# Altium PCB Motion Control PCB.PcbDoc (part 2 of 2)
Units mm, origin at the board's own origin, x right, y up, seen from the top; angles counter-clockwise.
Board outline 100 x 60 mm, 4 copper layers (Top Layer, Signal Layer 1, Signal Layer 2, Bottom Layer), stack 1.642 mm thick; 129 components, 65 nets, 423 pads, 398 vias.
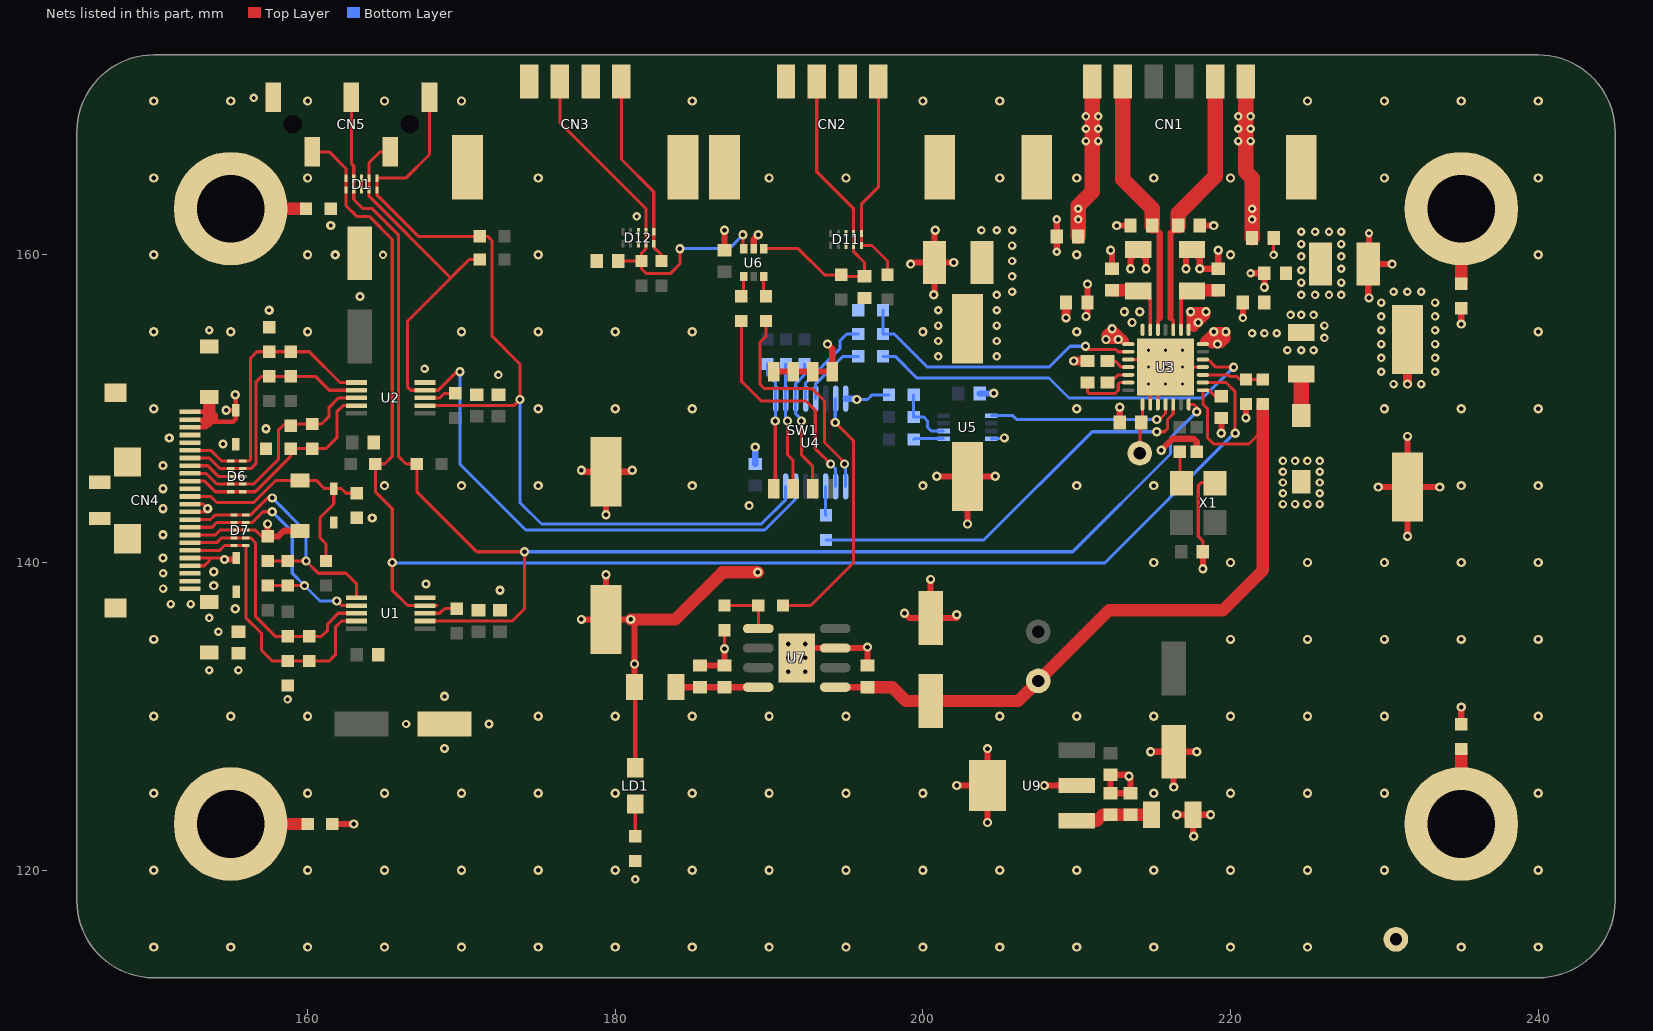
[diagram p4: the nets of this part, all layers, seen from the top]

## Via types
v1: diameter 0.6, hole 0.3, Top Layer to Bottom Layer, tented both sides, 244 vias
v2: diameter 0.55, hole 0.25, Top Layer to Bottom Layer, tented both sides, 113 vias
v3: diameter 0.6, hole 0.25, Top Layer to Bottom Layer, tented both sides, 20 vias
v4: diameter 0.6, hole 0.3, Top Layer to Bottom Layer, 12 vias
v5: diameter 0.5, hole 0.2, Top Layer to Bottom Layer, 9 vias

## Nets (pads, with @x,y where several pads share a name; then routed paths per layer and width w, separated by ;. In a path a pad name is that pad's centre, name@x,y a point inside that pad or via, vN(x,y) a via of type N, cw(c..) or ccw(c..) an arc to the next point about the centre after c; other vN are vias at no path point) (continued)
GND: C1.- C2.1 C3.1 C4.1 C5.- C6.1 C7.1 C8.1 C9.1 C10.1 C11.1 C12.2 C13.2 C16.1 C17.1 C18.1 C19.1 C20.1 C21.1 C22.1 C23.1 C24.1 C25.1 C26.1 C27.1 C28.1 C29.1 C30.- C32.1 C33.- C34.1 C39.1 C40.- C41.- C42.1 C46.- C47.1 C48.1 C49.1 CN1.MP1 CN1.MP2 CN2.2 CN2.4 CN2.MP1 CN2.MP2 CN3.2 CN3.4 CN3.MP1 CN3.MP2 CN4.4 CN4.5 CN4.8 CN4.11 CN4.13 CN4.14 CN4.17 CN4.20 CN4.21 CN4.25 CN4.26 CN4.27 CN4.28 CN4.29 CN4.30 CN5.1 D1.3 D1.8 D2.A D3.A D4.2 D5.2 D6.3 D6.8 D7.3 D7.8 D8.2 D9.A D11.3 D11.8 D12.3 D12.8 R1.2 R6.2 R7.2 R13.2 R14.1 R20.2 R21.1 R22.1 R23.1 R32.2 R33.1 R41.1 R42.1 R43.1 R44.1 R70.1 R75.1 SW1.5 SW1.6 SW1.7 SW1.8 U1.5 U2.5 U3.3 U3.9 U3.10 U3.18 U3.29 U4.8 U5.4 U6.2 U7.3 U7.9 U9.2 U9.4 X1.2 | length 154.6
  Top Layer w0.2: CN4.21@152.36,139.79 153.29,139.79 153.6,140.1 153.6,140.29 ; CN4.20@152.36,140.29 153.6,140.29 ; CN4.17@152.36,141.79 153.99,141.79 154.3,142.1 D7.8@155.213,142.1 D7.3@155.988,142.1 156.6,142.1 157,141.7 R1.2@157.4,141.7 ; CN4.14@152.36,143.29 153.29,143.29 v3(153.5,143.5) 153.21,143.79 CN4.13@152.36,143.79 ; CN4.8@152.36,146.29 153.51,146.29 154.2,145.6 D6.8@155.012,145.6 D6.3@155.787,145.6 ; v3(154.6,140.2) 154.51,140.29 153.6,140.29 ; D1.3@163.5,164.213 D1.8@163.5,164.988 ; D12.8@181.5,160.725 D12.3@181.5,161.5 ; v1(187.1,134.4) R23.1@187.1,135.6 ; U3.3@213.35,153.2 215.275,153.2 v5(215.775,152.7) ; U3.9@214.775,150.275 214.775,151.7 U3.29@215.275,152.2 ; U3.10@215.275,150.275 U3.29@215.275,152.2 ; C39.1@218.2,140.7 218.2,141.4 217.9,141.7 217.9,145 218.1,145.2 218.66,145.2 X1.2@219,145.54 ; U3.18@218.2,152.7 v5(216.875,152.7) v5(215.775,152.7) ; v2(222.8,160) C16.1@222.8,161.1 ; U3.29@215.275,152.2 v5(215.775,152.7)
  Top Layer w0.4: v3(154.6,140.2) 155.27,140.2 D4.2@155.36,140.29 ; v1(157.4,142.5) R1.2@157.4,141.7 158.1,141.7 158.46,142.06 D9.A@159.5,142.06 ; R43.1@161.6,123 v1(163,123) ; v1(177.8,146) 177.9,145.9 C41.-@179.4,145.9 ; v1(179.4,143.1) C41.-@179.4,145.9 ; v1(181.1,146) 181,145.9 C41.-@179.4,145.9 ; C29.1@185.5,133.3 C32.1@187.1,133.3 v1(187.1,134.4) ; C27.1@187.1,160.3 v1(187.1,161.6) ; U6.2@189,160.4 189,161 v1(189.3,161.3) ; SW1.8@190.295,152.41 SW1.7@191.565,152.41 SW1.6@192.835,152.41 SW1.5@194.105,152.41 194.105,153.895 v1(193.8,154.2) ; U7.9@191.8,133.8 192.435,134.435 U7.3@194.3,134.435 v1@196.335,134.435 ; C42.1@196.4,133.3 196.4,134.37 v1@196.335,134.435 ; v1(196.4,134.5) v1@196.335,134.435 ; v1(198.8,136.7) 199.1,136.4 C30.-@200.5,136.4 ; v1(199.2,159.4) 199.3,159.5 C12.2@200.75,159.5 ; v1(200.5,138.9) C30.-@200.5,136.4 ; v1(200.7,157.4) 200.75,157.45 C12.2@200.75,159.5 ; v1(200.8,161.6) 200.75,161.55 C12.2@200.75,159.5 ; v1(200.9,145.6) C33.-@202.9,145.6 ; v1(202,159.5) C12.2@200.75,159.5 ; v1(202.2,125.5) U9.4@204.2,125.5 ; v1(202.2,136.6) 202.2,136.4 C30.-@200.5,136.4 ; v1(202.9,142.5) C33.-@202.9,145.6 ; v1(204.2,123.1) U9.4@204.2,125.5 ; v1(204.2,127.9) U9.4@204.2,125.5 ; v1(204.7,145.6) C33.-@202.9,145.6 ; v1(207.9,125.5) U9.2@210,125.5 ; v2(208.7,160.2) v2(208.7,162.3) ; v1(210.6,156) 210.7,156 C9.1@210.7,156.9 v1(210.7,158.1) ; v1(212.2,160.3) 212.3,160.2 C20.1@212.3,159.1 ; v1(212.6,161.9) C18.1@213.5,161.9 ; C23.1@212.8,149.1 v1(212.8,150.1) ; v1(213.5,159.1) 213.5,159.75 R32.2@214,160.25 ; v1(214.5,159.1) 214.5,159.75 ; v1(214.8,127.7) C46.-@216.3,127.7 ; v1(215.5,147.3) 216.25,148.05 217.6,148.05 217.8,147.85 R70.1@217.8,147.2 ; v1(216.3,125.4) C46.-@216.3,127.7 ; v1(217.1,159.1) 217.1,159.85 217.5,160.25 218,159.75 v1(218,159.1) C21.1@219.2,159.1 v1(219.2,160.3) ; v1(217.8,127.7) C46.-@216.3,127.7 ; C17.1@218,161.9 v1(218.9,161.9) ; v1(218.2,139.6) C39.1@218.2,140.7 ; v1(219.4,148.4) C24.1@219.4,149.4 ; v2(220.8,155.9) C10.1@220.8,156.9 ; v1(221,149.4) R75.1@221,150.3 ; v2(221.3,158.8) C11.1@222.2,158.8 v1(222.2,157.9) ; v1(229,157.2) 228.95,157.25 C13.2@228.95,159.4 ; v2(229,161.4) 229,159.45 C13.2@228.95,159.4 ; v1(230.5,159.4) C13.2@228.95,159.4 ; v1(231.5,141.7) C40.-@231.5,144.9 ; v1(231.5,148.2) C40.-@231.5,144.9 ; v1(233.6,144.9) C40.-@231.5,144.9 ; R44.1@235,129.481 v1(235,130.6) ; v1(235,155.5) R42.1@235,156.519 ; R32.2@214,160.25 214.25,160.25 214.5,160 214.5,159.75 ; R32.2@214,160.25 214.5,159.75 ; C40.-@231.5,144.9 v1(229.6,144.9) C40.-@231.5,144.9 ; C48.1@212.2,125 C49.1@212.2,126.2 213.3,126.2 v1(213.4,126.1) 213.5,126 C47.1@213.5,125 C48.1@212.2,125
  Bottom Layer w0.2: v1(195.7,150.6) 196.4,150.6 196.7,150.9 R22.1@197.8,150.9 ; U5.4@204.45,148.05 205.25,148.05 v1(205.3,148.1)
  Bottom Layer w0.4: C22.1@189.1,146.4 v1(189.1,147.5) ; U4.8@194.975,150.65 195.65,150.65 v1(195.7,150.6) ; C25.1@203.7,150.979 204.579,150.979 v1(204.6,151)
  other v1: 150,115 155,115 160,115 165,115 170,115 175,115 180,115 185,115 190,115 195,115 200,115 205,115 210,115 215,115 220,115 225,115 235,115 240,115 150,120 160,120 165,120 170,120 175,120 180,120 185,120 190,120 195,120 200,120 205,120 210,120 215,120 220,120 225,120 230,120 240,120 150,125 160,125 165,125 170,125 175,125 180,125 185,125 190,125 195,125 200,125 215,125 220,125 225,125 230,125 240,125 150,130 155,130 160,130 175,130 180,130 185,130 190,130 195,130 205,130 210,130 215,130 220,130 225,130 230,130 240,130 150,135 220,135 225,135 230,135 235,135 240,135 215,140 220,140 225,140 230,140 235,140 240,140 188.7,143.7 165,145 170,145 175,145 185,145 200,145 210,145 215,145 235,145 240,145 150,150 175,150 180,150 185,150 210,150 230,150 235,150 240,150 150,155 155,155 160,155 170,155 175,155 180,155 185,155 200,155 210,155 240,155 150,160 160,160 175,160 210,160 220,160 240,160 150,165 160,165 175,165 190,165 195,165 205,165 210,165 215,165 220,165 230,165 240,165 150,170 155,170 160,170 165,170 170,170 185,170 200,170 205,170 225,170 230,170 235,170 240,170
  other v2: 181.3,119.4 166.4,129.5 158.7,131.1 153.6,133 155.5,133 172.4,152.2 167.6,152.6 153.6,155.1 164.9,160 181.4,162.5 156.5,170.2
  other v3: 168.9,127.9 171.8,129.5 168.9,131.3 172.5,138.2 167.7,138.6 150.6,140.3 150.6,141.8 164.2,142.9 150.6,143.5 150.6,144.8 150.6,146.3 154.5,147.7 151,148.1 157.3,148.7 157.5,156.4 163.4,157.3 161.8,160 161.5,161.9
  other v4: 191.25,132.9 192.35,132.9 191.25,133.8 192.35,133.8 191.25,134.7 192.35,134.7
  other v5: 214.675,151.6 215.775,151.6 216.875,151.6 214.675,152.7 214.675,153.8 215.775,153.8 216.875,153.8
HV_CBL_DISC: CN4.12 D8.1 D9.C R14.2 R24.2 | length 17.2
  Top Layer w0.2: CN4.12@152.36,144.29 153.71,144.29 154.1,143.9 156.5,143.9 157.94,145.34 D9.C@159.5,145.34 160.56,145.34 161.1,144.8 D8.1@161.7,144.8 ; R24.2@161.2,140.1 161.2,141.2 160.8,141.6 160.8,142.9 161.7,143.8 D8.1@161.7,144.8 ; R14.2@163.2,144.5 162.5,144.5 162.2,144.8 D8.1@161.7,144.8
INDEX: R31.2 U3.12 | length 26.9
  Top Layer w0.2: v1(215.2,148.5) 215.7,148.5 215.9,148.7 215.9,149.3 216.275,149.675 U3.12@216.275,150.275
  Bottom Layer w0.2: R31.2@193.7,141.469 203.969,141.469 211,148.5 v1(215.2,148.5)
LV_SCL_TEST: CN5.4 D1.4 D1.7 R17.1 U2.4 U4.14 | length 57.3
  Top Layer w0.2: CN5.4@165.38,166.7 164.7,166.7 164,166 D1.7@164,164.988 D1.4@164,164.213 164,163.8 169.3,158.5 ; v1(169.9,152.4) 169.7,152.4 168.5,151.2 U2.4@167.625,151.2 166.7,151.2 166.5,151.4 166.5,155.7 169.3,158.5 ; R17.1@171.2,159.7 170.5,159.7 169.6,158.8 169.3,158.5
  Bottom Layer w0.2: v1(169.9,152.4) 169.9,146.4 174.2,142.1 189.7,142.1 191.725,144.125 U4.14@191.725,144.95
LV_SDA_TEST: CN5.5 D1.5 D1.6 R16.1 U2.2 U4.15 | length 61.1
  Top Layer w0.2: U2.2@167.625,150.2 173.4,150.2 v1(173.8,150.6) 173.8,152.9 172,154.7 172,160.9 171.7,161.2 R16.1@171.2,161.2 167.2,161.2 164.5,163.9 D1.5@164.5,164.213 D1.6@164.5,164.988 166.388,164.988 167.92,166.52 CN5.5@167.92,170.255
  Bottom Layer w0.2: v1(173.8,150.6) 173.8,143.9 175.2,142.5 189.5,142.5 191.075,144.075 U4.15@191.075,144.95
LV_STEP_TEST: CN5.2 D1.1 D1.10 R19.1 U1.4 U3.16 | length 99.7
  Top Layer w0.2: CN5.2@160.3,166.7 161.4,166.7 162.5,165.6 D1.10@162.5,164.988 D1.1@162.5,164.213 162.5,163.2 163.2,162.5 164,162.5 165.5,161 165.5,146.9 165,146.4 R19.1@164.4,146.4 164.4,144.6 165.5,143.5 v1(165.5,140) 165.5,138.2 166.5,137.2 U1.4@167.625,137.2 168.4,137.2 ; U3.16@218.2,151.7 219.704,151.7 220.3,151.104 v1(220.3,148.4)
  Bottom Layer w0.2: v1(165.5,140) 165.54,139.96 211.809,139.96 220.249,148.4 v1(220.3,148.4)
LV_UART_TEST: CN5.3 D1.2 D1.9 R18.1 U1.2 U3.14 | length 96.4
  Top Layer w0.2: CN5.3@162.84,170.255 162.84,165.96 163,165.8 D1.9@163,164.988 D1.2@163,164.213 163,163.6 163.6,163 164.2,163 165.9,161.3 165.9,146.9 166.4,146.4 R18.1@167.1,146.4 167.1,144.6 171,140.7 v1(174.1,140.7) 174.1,137 173.3,136.2 U1.2@167.625,136.2 ; U3.14@217.275,150.275 217.625,150.275 217.8,150.1 v1(217.8,149.8)
  Bottom Layer w0.2: v1@174.1,140.5 174.3,140.7 209.749,140.7 216.1,147.051 216.1,148.1 v1(217.8,149.8)
NetC9_2: C9.2 C10.2 C11.2 C12.1 C13.1 C14.2 C33.+ C40.+ FB4.1 U3.22 U3.28 | length 9.9
  Top Layer w0.25: U3.22@217.275,155.125 217.275,156.175 v1(217.4,156.3)
  Top Layer w0.6: v1(209.3,155.9) C9.2@209.3,156.9 ; v1(209.8,153.1) C14.2@210.7,153.1 ; v1(217.4,156.3) v1(218.4,156.3) v1@218.4,156.1 ; C40.+@231.4,154.4 C40.+@231.5,154.5 v1(231.5,151.6) ; v1@218.4,156.1 217.9,156.1 217.6,155.8 217.6,155.3 v1(217.9,155.6) v1@218.4,156.1
  other v1: 213.6,155.6 213.1,156.3 214.1,156.3
  other v2: 230.6,151.6 232.4,151.6 229.8,152.4 233.3,152.4 229.8,153.3 233.3,153.3 201,153.4 204.8,153.4 223.7,153.8 224.6,153.8 225.4,153.8 229.8,154.2 233.3,154.2 201,154.4 204.8,154.4 226.1,154.6 221.4,154.9 222.2,154.9 223,154.9 229.8,155.1 233.3,155.1 201,155.4 204.8,155.4 226.1,155.4 229.8,156 233.3,156 223.9,156.1 224.6,156.1 225.4,156.1 201,156.4 204.8,156.4 229.8,156.9 233.3,156.9 204.8,157.4 224.6,157.4 225.5,157.4 226.4,157.4 227.2,157.4 205.8,157.6 230.6,157.6 231.5,157.6 232.4,157.6 224.6,158.2 227.2,158.2 205.8,158.6 224.6,159 227.2,159.1 205.8,159.6 224.6,159.9 227.2,159.9 205.8,160.6 224.6,160.7 227.2,160.7 224.6,161.5 225.5,161.5 226.4,161.5 227.2,161.5 203.8,161.6 204.8,161.6 205.8,161.6
NetC14_1: C14.1 U3.6 | length 3.8
  Top Layer w0.2: C14.1@210.7,151.7 210.7,151.1 210.8,151 212.5,151 212.55,151.05 212.554,151.05 212.7,151.196 212.7,151.6 212.8,151.7 U3.6@213.35,151.7
NetC15_1: C15.1 U3.5 | length 1.6
  Top Layer w0.2: C15.1@212,151.7 212.2,151.7 212.7,152.2 U3.5@213.35,152.2
NetC15_2: C15.2 U3.4 | length 1.5
  Top Layer w0.2: C15.2@212,153.1 212.5,153.1 212.9,152.7 U3.4@213.35,152.7
NetC16_2: C16.2 CN1.1 U3.21 | length 15.5
  Top Layer w0.2: U3.21@218.2,154.2 218.7,154.2
  Top Layer w0.6: 218.3,154.375 v4@218.9,154.975 ; 218.744,154.244 218.788,154.2 v4(219.15,154.2) ; v4@218.9,154.975 v4(218.9,155) ; v4@218.9,154.975 218.9,154.45 v4(219.15,154.2) ; v4(218.9,155) 219.15,154.75 v4(219.15,154.2) ; v4(218.9,155) v4(219.7,155) 219.7,154.551 219.349,154.2 v4(219.15,154.2)
  Top Layer w1: CN1.1@221,170.88 221,168.2 221,165.4 221.4,165 v2(221.4,163) v2(221.4,162.3) C16.2@221.4,161.1
  other v2: 220.5,167.4 221.3,167.4 220.5,168.2 221.3,168.2 220.5,169 221.3,169
NetC17_2: C17.2 CN1.2 U3.24 | length 17
  Top Layer w0.25: 216.1,155.9 216.275,155.725 U3.24@216.275,155.125
  Top Layer w0.4: 216.1,155.9 216.1,161.4 C17.2@216.6,161.9
  Top Layer w1: C17.2@216.6,161.9 216.6,162.7 219,165.1 CN1.2@219,170.88
NetC18_2: C18.2 CN1.5 U3.26 | length 16.8
  Top Layer w0.25: U3.26@215.275,155.125 215.275,155.775 215.4,155.9
  Top Layer w0.4: C18.2@214.9,161.9 215.4,161.4 215.4,155.9
  Top Layer w1: CN1.5@213,170.88 213,164.9 214.9,163 C18.2@214.9,161.9
NetC19_2: C19.2 CN1.6 U3.1 | length 13.6
  Top Layer w0.2: 212.961,154.3 213.061,154.2 U3.1@213.35,154.2
  Top Layer w0.6: 213.1,154.4 212.7,154.8 ; 212.7,154.8 v4(212.7,154.5) v4(211.9,154.5) 211.9,154.8 v4(212.3,155.2) 212.7,154.8
  Top Layer w1: C19.2@210.1,161.2 210.1,163.2 211,164.1 CN1.6@211,170.88
  other v2: 210.1,162.3 210.1,163 210.6,167.4 211.4,167.4 210.6,168.2 211.4,168.2 210.6,169 211.4,169
NetC20_2: C20.2 R32.1 U3.27 | length 4.6
  Top Layer w0.25: R32.1@214,157.65 214.3,157.65 214.725,157.225 214.725,157.129 214.775,157.079 U3.27@214.775,155.125
  Top Layer w0.8: C20.2@212.3,157.7 R32.1@213.85,157.7
NetC21_2: C21.2 R33.2 U3.23 | length 4.9
  Top Layer w0.25: U3.23@216.775,155.125 216.775,157.225 217.2,157.65 R33.2@217.5,157.65 R33.2@217.5,157.55
  Top Layer w0.8: R33.2@217.5,157.55 217.65,157.7 C21.2@219.2,157.7
NetC23_2: C23.2 TP4.1 U3.8 | length 3.2
  Top Layer w0.2: TP4.1@214.1,147.1 214.1,149 214.275,149.175 U3.8@214.275,150.275
NetC29_2: C29.2 C32.2 FB1.2 U7.8 | length 5.4
  Top Layer w0.4: FB1.2@183.95,131.9 183.955,131.895 U7.8@189.3,131.895
NetC47_2: C47.2 C48.2 FB3.2 U9.1 | length 5
  Top Layer w0.8: U9.1@210,123.2 211.3,123.2 211.7,123.6 C48.2@212.2,123.6 FB3.2@214.85,123.6
NetD10_2: D10.2 FB4.2 | length 2.7
  Top Layer w1: D10.2@224.6,149.56 FB4.2@224.6,152.25
NetLD1_2: LD1.2 R20.1 | length 2.1
  Top Layer w0.2: R20.1@181.3,122.2 LD1.2@181.3,124.3
NetMP1_1: MP1.1 R41.2 | length 4.9
  Top Layer w0.8: MP1.1@155,163 R41.2@159.9,163
NetMP2_1: MP2.1 R42.2 | length 4.9
  Top Layer w0.8: R42.2@235,158.119 MP2.1@235,163
NetMP3_1: MP3.1 R43.2 | length 5
  Top Layer w0.8: MP3.1@155,123 R43.2@160,123
NetMP4_1: MP4.1 R44.2 | length 4.9
  Top Layer w0.8: MP4.1@235,123 R44.2@235,127.881
NetR12_2: R12.2 U2.3 | length 2.1
  Top Layer w0.2: U2.3@167.625,150.7 168.6,150.7 168.9,151 R12.2@169.6,151
NetR15_2: R15.2 U1.3 | length 2.2
  Top Layer w0.2: U1.3@167.625,136.7 168.6,136.7 168.9,137 R15.2@169.7,137
NetR21_2: R21.2 R29.2 U3.2 | length 19.1
  Top Layer w0.2: v1(210.573,154.059) 210.782,153.85 212.55,153.85 212.7,153.7 U3.2@213.35,153.7
  Bottom Layer w0.2: R21.2@197.4,156.4 R29.2@197.4,154.854 198.146,154.854 200.3,152.7 208.2,152.7 209.559,154.059 v1(210.573,154.059)
NetR22_2: R22.2 R40.2 U5.6 | length 4
  Bottom Layer w0.2: R22.2@199.4,150.9 R40.2@199.4,149.454 200.046,149.454 200.3,149.2 200.3,148.8 200.55,148.55 U5.6@201.35,148.55
NetR23_2: R23.2 R73.2 U7.5 | length 3.7
  Top Layer w0.2: R23.2@187.1,137.2 R73.2@189.3,137.2 U7.5@189.3,135.705
NetR29_1: R29.1 U4.4 | length 6.1
  Bottom Layer w0.2: U4.4@192.375,150.65 192.375,151.675 194.6,153.9 194.6,154.4 195.054,154.854 R29.1@195.8,154.854
NetR30_2: R30.2 X1.3 | length 1.7
  Top Layer w0.2: R30.2@216.7,147.2 216.7,145.64 X1.3@216.8,145.54
NetR31_1: R31.1 U4.11 | length 1.9
  Bottom Layer w0.2: U4.11@193.675,144.95 193.675,143.094 R31.1@193.7,143.069
NetR34_1: R34.1 U4.5 | length 4.5
  Bottom Layer w0.2: U4.5@193.025,150.65 193.025,151.625 194.8,153.4 R34.1@195.8,153.4
NetR34_2: R34.2 U3.19 | length 27
  Top Layer w0.2: U3.19@218.2,153.2 218.546,153.2 219.046,152.7 v1(220.2,152.7)
  Bottom Layer w0.2: R34.2@197.4,153.4 198.2,153.4 199.6,152 208.2,152 209.5,150.7 218.2,150.7 v1(220.2,152.7)
NetR35_1: R35.1 SW1.1 U4.1 | length 8.4
  Top Layer w0.2: SW1.1@190.295,144.79 190.4,144.895 v1(190.4,149.2)
  Bottom Layer w0.2: R35.1@189.9,152.9 189.9,152.2 190.425,151.675 U4.1@190.425,150.65 190.425,149.225 v1(190.4,149.2)
NetR36_1: R36.1 SW1.2 U4.2 | length 8.3
  Top Layer w0.2: v1(191.2,149.2) 191.2,147 191.565,146.635 SW1.2@191.565,144.79
  Bottom Layer w0.2: R36.1@191.1,152.9 191.075,152.875 U4.2@191.075,150.65 191.075,149.325 v1(191.2,149.2)
NetR37_1: R37.1 SW1.3 U4.3 | length 9
  Top Layer w0.2: v1@192.15,149.15 192.2,149.2 v1(192.1,149.2) 192.1,147 192.835,146.265 SW1.3@192.835,144.79
  Bottom Layer w0.2: v1(192.1,149.2) 192.1,149.3 191.725,149.675 U4.3@191.725,150.65 191.725,151.625 192.3,152.2 R37.1@192.3,152.9
NetR39_1: R39.1 U5.5 | length 2
  Bottom Layer w0.2: R39.1@199.4,148 199.45,148.05 U5.5@201.35,148.05
NetR71_1: R71.1 U4.9 | length 15
  Top Layer w0.2: R71.1@189.8,155.7 189.8,154.7 189.4,154.3 189.4,151.6 189.7,151.3 192.8,151.3 193.6,150.5 193.6,147.8 194.9,146.5 v1(194.9,146.4)
  Bottom Layer w0.2: v1(194.9,146.4) 194.975,146.325 U4.9@194.975,144.95
NetR71_2: R71.2 U6.6 | length 1.4
  Top Layer w0.2: U6.6@189.65,158.6 189.65,157.45 R71.2@189.8,157.3
NetR72_1: R72.1 U4.10 | length 15
  Top Layer w0.2: R72.1@188.2,155.7 188.2,151.8 189.5,150.5 192.4,150.5 193,149.9 193,147.4 v1(194,146.4)
  Bottom Layer w0.2: v1(194,146.4) 194.325,146.075 U4.10@194.325,144.95
NetR72_2: R72.2 U6.4 | length 1.4
  Top Layer w0.2: R72.2@188.2,157.3 188.35,157.45 U6.4@188.35,158.6
NetR73_1: R73.1 U4.7 | length 16.9
  Top Layer w0.2: R73.1@190.9,137.2 192.7,137.2 195.5,140 195.5,147.9 v1(194.3,149.1)
  Bottom Layer w0.2: v1(194.3,149.1) 194.3,150.625 U4.7@194.325,150.65
NetR74_1: R74.1 R75.2 U3.17 | length 4
  Top Layer w0.2: U3.17@218.2,152.2 219.851,152.2 219.951,152.1 220.4,152.1 220.6,151.9 R75.2@221,151.9 R74.1@222.1,151.9
NetU3_11: U3.11 U5.1 | length 12.2
  Top Layer w0.2: v1(215.2,149.3) 215.393,149.3 215.775,149.682 U3.11@215.775,150.275
  Bottom Layer w0.2: U5.1@204.45,149.55 205.85,149.55 206.1,149.3 v1(215.2,149.3)
OP1_1: CN2.1 D11.1 D11.10 R47.1 | length 13.7
  Top Layer w0.2: CN2.1@197.1,170.88 197.1,164.4 196,163.3 D11.1@196,161.388 D11.10@196,160.613 196.688,160.613 197.7,159.6 R47.1@197.7,158.7
OP1_3: C26.2 CN2.3 D11.2 D11.9 R45.1 U6.1 | length 20.9
  Top Layer w0.2: U6.1@189.65,160.4 191.9,160.4 193.6,158.7 R45.1@194.7,158.7 194.8,158.6 C26.2@196.2,158.6 196.2,159.5 195.5,160.2 D11.9@195.5,160.613 D11.2@195.5,161.388 195.5,163 193.1,165.4 CN2.3@193.1,170.88
OP2_1: CN3.1 D12.1 D12.10 R46.1 | length 12.4
  Top Layer w0.2: CN3.1@180.4,170.88 180.4,166.2 182.5,164.1 D12.1@182.5,161.5 D12.10@182.5,160.725 182.5,160.5 183,160 R46.1@183,159.6
OP2_3: C28.2 CN3.3 D12.2 D12.9 R48.1 U6.3 | length 25
  Top Layer w0.2: CN3.3@176.4,170.88 176.4,168.6 182,163 D12.2@182,161.5 D12.9@182,160.725 182,160.4 181.7,160.1 R48.1@181.7,159.6 ; C28.2@180.2,159.6 R48.1@181.7,159.6 ; v1(184.2,160.4) 184.2,159.4 183.6,158.8 182,158.8 181.7,159.1 R48.1@181.7,159.6 ; v1(188.3,161.3) 188.3,160.45 U6.3@188.35,160.4
  Bottom Layer w0.2: v1(184.2,160.4) 187.4,160.4 v1(188.3,161.3)
SCL+: CN4.7 D6.4 D6.7 R8.2 R9.1 U2.7 | length 17.1
  Top Layer w0.2: CN4.7@152.36,146.79 153.61,146.79 154.3,146.1 D6.7@155.012,146.1 D6.4@155.787,146.1 156.3,146.1 156.65,146.45 156.65,151.75 157,152.1 R8.2@158.9,152.1 160.5,152.1 161.4,151.2 U2.7@163.175,151.2
SCL-: CN4.6 D6.5 D6.6 R7.1 R8.1 U2.6 | length 18.7
  Top Layer w0.2: CN4.6@152.36,147.29 153.71,147.29 154.4,146.6 D6.6@155.012,146.6 D6.5@155.787,146.6 156.2,146.6 156.3,146.7 156.3,153.3 156.7,153.7 R7.1@157.5,153.7 R8.1@158.9,153.7 160.1,153.7 162.1,151.7 U2.6@163.175,151.7
SDA+: CN4.9 D6.2 D6.9 R10.1 R11.1 U2.8 | length 14.9
  Top Layer w0.2: CN4.9@152.36,145.79 153.41,145.79 154.1,145.1 D6.9@155.012,145.1 D6.2@155.787,145.1 156.5,145.1 158.1,146.7 158.1,148.6 158.5,149 R11.1@160.3,149 160.9,149 161.4,149.5 161.4,150.1 162,150.7 U2.8@163.175,150.7
SDA-: CN4.10 D6.1 D6.10 R11.2 R13.1 U2.9 | length 14.7
  Top Layer w0.2: CN4.10@152.36,145.29 153.31,145.29 154,144.6 D6.10@155.012,144.6 D6.1@155.787,144.6 156.6,144.6 158.9,146.9 R13.1@158.9,147.4 R11.2@160.3,147.4 161.2,147.4 161.9,148.1 161.9,149.8 162.3,150.2 U2.9@163.175,150.2
STEP+: CN4.16 D7.4 D7.7 R2.2 R3.1 U1.7 | length 17.7
  Top Layer w0.2: CN4.16@152.36,142.29 153.79,142.29 154.1,142.6 D7.7@155.213,142.6 D7.4@155.988,142.6 156.4,142.6 157.1,143.3 v1(157.7,143.3) ; R3.1@157.4,138.5 R2.2@158.7,138.5 v1(159.8,138.5) ; v1(161.9,137.5) 162.2,137.2 U1.7@163.175,137.2
  Bottom Layer w0.2: v1(157.7,143.3) 159,142 159,139.3 v1(159.8,138.5) 160.8,137.5 v1(161.9,137.5)
STEP-: CN4.15 D7.5 D7.6 R1.1 R2.1 U1.6 | length 18.2
  Top Layer w0.2: CN4.15@152.36,142.79 153.69,142.79 154,143.1 D7.6@155.213,143.1 D7.5@155.988,143.1 156.3,143.1 157.4,144.2 v1(157.7,144.2) ; R1.1@157.4,140.1 v1(159.9,140.1) 160.7,139.3 162.5,139.3 163.175,138.625 U1.6@163.175,137.7
  Bottom Layer w0.2: v1(157.7,144.2) 159.9,142 v1(159.9,140.1)
UART+: CN4.18 D7.2 D7.9 R4.1 R5.1 U1.8 | length 17.3
  Top Layer w0.2: CN4.18@152.36,141.29 154.09,141.29 154.4,141.6 D7.9@155.213,141.6 D7.2@155.988,141.6 156.3,141.6 156.6,141.3 156.6,136.5 157.9,135.2 R5.1@160.1,135.2 160.9,135.2 161.3,135.6 161.3,136 162,136.7 U1.8@163.175,136.7
UART-: CN4.19 D7.1 D7.10 R5.2 R6.1 U1.9 | length 19.6
  Top Layer w0.2: CN4.19@152.36,140.79 154.29,140.79 154.6,141.1 D7.10@155.213,141.1 D7.1@155.988,141.1 155.988,136.412 157,135.4 157,134.3 157.7,133.6 R5.2@160.1,133.6 161.4,133.6 161.8,134 161.8,135.8 162.2,136.2 U1.9@163.175,136.2
VIO_M: C24.2 C30.+ C42.2 R74.2 TP2.1 U3.15 U7.1 | length 51.2
  Top Layer w0.2: C24.2@219.4,150.8 219,150.8 218.6,151.2 U3.15@218.2,151.2 218.2,150.3 218.5,150 218.5,148.1 218.9,147.7 221.2,147.7 222.1,148.6
  Top Layer w0.4: U7.1@194.3,131.895 196.395,131.895 C42.2@196.4,131.9
  Top Layer w0.8: C42.2@196.4,131.9 198,131.9 198.9,131 C30.+@200.5,131 206.2,131 TP2.1@207.5,132.3 212.1,136.9 219.5,136.9 222.1,139.5 222.1,148.6 R74.2@222.1,150.3
VM: C34.2 C41.+ CN4.1 CN4.2 CN4.3 CN4.22 CN4.23 CN4.24 D2.C D3.C D4.1 D5.1 D10.1 FB1.1 FB3.1 LD1.1 TP1.1 | length 40
  Top Layer w0.2: v2(150.6,139.3) v2@150.605,139.295 ; v2@150.605,138.295 v2(150.6,138.3) v2@150.62,138.3 ; v2@152.35,137.35 v2(152.4,137.3) v2@152.495,137.3 ; CN4.24@152.355,138.295 CN4.24@152.36,138.29 CN4.24@152.4,138.25 ; CN4.22@152.355,139.295 CN4.22@152.36,139.29 ; D4.1@155.301,138.149 D4.1@155.36,138.09
  Top Layer w0.3: CN4.3@152.36,148.79 153.39,148.79 153.755,149.155 ; CN4.2@152.36,149.29 153.31,149.29 153.445,149.155 153.755,149.155 ; CN4.1@152.36,149.79 153.6,149.79 153.81,149.79 154.03,149.57 154.03,149.155 ; v1(154.7,149.9) 154.71,149.89 D5.1@155.33,149.89 ; v1(155.3,150.9) 155.33,150.87 D5.1@155.33,149.89 ; D4.1@155.33,138.06 D4.1@155.36,138.09 ; FB1.1@181.25,131.9 181.3,131.85 LD1.1@181.3,126.65 ; 153.755,149.155 154.03,149.155 ; 154.03,149.155 155.155,149.155 155.33,149.33 D5.1@155.33,149.89
  Top Layer w0.4: v1(177.8,136.3) C41.+@179.4,136.3 ; C41.+@179.35,136.25 C41.+@179.4,136.3 ; v1(179.4,139.2) C41.+@179.4,136.3 ; v1(181,136.3) C41.+@179.4,136.3 ; FB1.1@181.25,131.9 v1(181.25,133.4) v1@181.25,136.25 ; v1(216.5,123.6) FB3.1@217.55,123.6 ; v1(217.6,122.2) 217.55,122.25 FB3.1@217.55,123.6 ; v1(218.7,123.6) FB3.1@217.55,123.6
  Top Layer w0.8: 153.445,149.155 153.6,149.31 153.6,149.79 D3.C@153.6,150.76 ; v1(181,136.3) 183.9,136.3 186.96,139.36 v1(189.26,139.36)
  other v1: 155.3,137 153.9,138.5 153.9,139.4
  other v2: 154.2,135.5 153.6,136.4 151.1,137.3 223.4,143.8 224.2,143.8 225,143.8 225.8,143.8 223.4,144.5 225.8,144.5 223.4,145.2 225.8,145.2 223.4,145.9 225.8,145.9 223.4,146.6 224.2,146.6 225,146.6 225.8,146.6
pads on no net: CN1.3 CN1.4 CN5.0 D11.4 D11.5 D11.6 D11.7 D12.4 D12.5 D12.6 D12.7 LD1.0 SW1.4 U3.7 U3.20 U3.25 U4.13 U5.3 U7.2 U7.4 U7.6 U7.7 X1.0 X1.1

## Polygon pours and split planes (outlines as drawn)
GND on Signal Layer 1 "GND_L02_P011" (solid, pour order 31): 145,118 145,168 cw(c150,168) 150,173 240,173 cw(c240,168) 245,168 245,118 cw(c240,118) 240,113 150,113 cw(c150,118)
GND on Top Layer "GND_L01_P012" (solid, remove dead copper, pour order 33): 145,118 145,168 cw(c150,168) 150,173 240,173 cw(c240,168) 245,168 245,118 cw(c240,118) 240,113 150,113 cw(c150,118)
VM on Top Layer "VM_L01_P016" (solid, pour order 39): 223,147.2 226.2,147.2 226.2,143.1 223,143.1
VM on Top Layer "VM_L01_P014" (solid, pour order 37): 149.8,139.8 156.5,139.8 156.5,134.8 149.8,134.8
NetC9_2 on Top Layer "VM_L01_P008" (solid, remove dead copper, pour order 26): 214.6,161.7 200.6,161.7 200.6,152.3 214.6,152.3
VM on Top Layer "VM_L01_P002" (solid, pour order 25): 221.2,151.8 230.5,151.8 230.5,161.8 221.2,161.8
NetC9_2 on Top Layer "NETC9_2_L01_P021" (solid, remove dead copper, pour order 21): 234,151.2 217,151.2 217,162 234,162
VM on Top Layer "VM_L01_P020" (solid, pour order 20): 149.9,139.8 149.9,134.6 156.5,134.6 156.5,139.8
GND on Bottom Layer "GND_L04_P013" (solid, remove dead copper, pour order 35): 145,118 145,168 cw(c150,168) 150,173 240,173 cw(c240,168) 245,168 245,118 cw(c240,118) 240,113 150,113 cw(c150,118)
NetC9_2 on Bottom Layer "NETC9_2_L04_P022" (solid, pour order 22): 208,162.4 234,162.4 234,150 208,150
VM on Signal Layer 2 "VM_L03_P008" (solid, remove dead copper, pour order 28): 145,118 145,168 cw(c150,168) 150,173 240,173 cw(c240,168) 245,168 245,118 cw(c240,118) 240,113 150,113 cw(c150,118)
NetC16_2 on Signal Layer 2 "NETC16_2_L03_P023" (solid, pour order 23): 223,170 223,153 217,153 217,170
NetC19_2 on Signal Layer 2 "NETC19_2_L03_P024" (solid, pour order 24): 209,170 214,170 214,154 209,154

## Other copper
Top Layer:
  text "TOP LAYER" at 181.83,104.38 h3
Signal Layer 1:
  text "INNER SIGNAL LAYER 1" at 168.46,104.67 h3
Signal Layer 2:
  text "INNER SIGNAL LAYER 2" at 168.71,104.91 h3

## Silkscreen, mask and mechanical layers (free items; w line width, h text height)
Top Overlay:
  region: 159.75,188.25
  region: 159.75,188.25
  region: 159.75,188.25
  region: 159.75,188.25
  region: 159.75,188.25
  region: 171,189.25
  region: 171,189.25
  region: 171,189.25
  region: 171,189.25
  region: 171,189.25
  lines w0.2: 156.2,152.8 156.8,152.8 156.9,152.7 ; 196.25,115.5 226,115.5 ; 196.25,117.5 226,117.5 ; 196.25,119.5 226,119.5 ; 201,113.5 201,121.5 201.25,121.5 ; 206,113.5 206,121.5 ; 211,113.5 211,121.5 ; 216,113.5 216,121.5 ; 221,113.5 221,121.5 ; 196.25,113.5 226,113.5 226,121.5 196.75,121.5 196.25,121.5 196.25,113.5
  lines w0.25: 215.3,146.3 215.3,146.5 216,147.2 ; 218.6,147.1 219.3,147.1 220,146.4 ; 223.5,136.25 243.5,136.25 ; 223.5,138.75 243.5,138.75 ; 228.5,133.75 228.5,141.25 ; 233.5,133.75 233.5,141.25 ; 238.5,133.75 238.5,141.25 ; 223.5,133.75 243.5,133.75 243.5,141.25 223.5,141.25 223.5,133.75
  lines w0.254: 162.4,139.5 164.8,141.9 166.6,141.9 ; 214.6,124.9 215,125.3 219.7,125.3
  text "LS2" at 182.8,171.2 h1.2
  text "LS1" at 199.6,171.2 h1.2
  text "MOTOR" at 223.8,171.2 h1.2
  text "1    2    3    4" at 226,139.5 h1
  text "RED  BLK  WHT  GRN" at 224.75,137 h1
  text "A    K    C    E" at 225.75,134.5 h1
  text "1    2    3    4    5    6" at 198.5,120 h1
  text "RED  BLU  WHT  YEL  GRN  BLK" at 197.25,118 h1
  text "BRN  ORG  WHT  BLK  RED  YEL" at 197.25,116 h1
  text "MC-1" at 164.1,115.7 h3
  text "A1   A2   NC   NC   B1   B2" at 198,114 h1
Mechanical 2:
  the board outline again, w0.2
Mechanical 3:
  circle w0.2: c155,123 r1.5
  circle w0.2: c235,123 r1.5
  circle w0.2: c235,163 r1.5
  circle w0.2: c155,163 r1.5
Drill Drawing:
  circle w0.2: c210.882,95.136 r0.556
  lines w0.2: 209.32,83.83 327.995,83.83 ; 209.32,98.83 327.995,98.83 ; 218.608,81.33 218.608,101.33 ; 228.672,81.33 228.672,101.33 ; 247.9,81.33 247.9,101.33 ; 256.438,81.33 256.438,101.33 ; 268.774,81.33 268.774,101.33 ; 293.834,81.33 293.834,101.33 ; 303.771,81.33 303.771,101.33 ; 316.308,81.33 316.308,101.33 ; 209.32,81.33 327.995,81.33 327.995,101.33 209.32,101.33 209.32,81.33 ; 210.327,84.858 210.605,84.858 210.882,84.58 211.16,84.858 211.438,84.858 211.16,85.136 211.438,85.413 211.16,85.413 210.882,85.691 210.605,85.413 210.327,85.413 210.605,85.136 210.327,84.858 ; 210.327,87.08 211.438,87.08 211.438,88.191 210.327,88.191 210.327,87.08 ; 210.327,89.58 210.882,89.858 211.438,89.58 211.16,90.136 211.438,90.691 210.882,90.413 210.327,90.691 210.605,90.136 210.327,89.58 ; 210.327,93.191 211.438,93.191 210.882,92.08 210.327,93.191 ; 210.327,97.08 210.327,97.358 210.605,97.636 210.327,97.913 210.327,98.191 210.605,98.191 210.882,97.913 211.16,98.191 211.438,98.191 211.438,97.913 211.16,97.636 211.438,97.358 211.438,97.08 211.16,97.08 210.882,97.358 210.605,97.08 210.327,97.08
  text "DRILL TABLE" at 262.82,101.07 h2
  text "Symbol" at 210.82,99.58 h1.2
  text "Count" at 219.358,99.58 h1.2
  text "Hole Size" at 229.422,99.58 h1.2
  text "Plated" at 248.65,99.58 h1.2
  text "Hole Type" at 257.188,99.58 h1.2
  text "Drill Layer Pair" at 269.524,99.58 h1.2
  text "Via/Pad" at 294.584,99.58 h1.2
  text "Pad Shape" at 304.521,99.58 h1.2
  text "Template" at 317.058,99.58 h1.2
  text "2" at 219.358,97.08 h1
  text "1.200mm (47.24mil)" at 229.422,97.08 h1
  text "NPTH" at 248.65,97.08 h1
  text "Round" at 257.188,97.08 h1
  text "Top Layer - Bottom Layer" at 269.524,97.08 h1
  text "Pad" at 294.584,97.08 h1
  text "Rounded" at 304.521,97.08 h1
  text "c0hn120" at 317.058,97.08 h1
  text "4" at 219.358,94.58 h1
  text "0.800mm (31.50mil)" at 229.422,94.58 h1
  text "PTH" at 248.65,94.58 h1
  text "Round" at 257.188,94.58 h1
  text "Top Layer - Bottom Layer" at 269.524,94.58 h1
  text "Pad" at 294.584,94.58 h1
  text "Rounded" at 304.521,94.58 h1
  text "c160h80" at 317.058,94.58 h1
  text "4" at 219.358,92.08 h1
  text "4.400mm (173.23mil)" at 229.422,92.08 h1
  text "NPTH" at 248.65,92.08 h1
  text "Round" at 257.188,92.08 h1
  text "Top Layer - Bottom Layer" at 269.524,92.08 h1
  text "Pad" at 294.584,92.08 h1
  text "Rounded" at 304.521,92.08 h1
  text "c740hn440" at 317.058,92.08 h1
  text "9" at 219.358,89.58 h1
  text "0.200mm (7.87mil)" at 229.422,89.58 h1
  text "PTH" at 248.65,89.58 h1
  text "Round" at 257.188,89.58 h1
  text "Top Layer - Bottom Layer" at 269.524,89.58 h1
  text "Via" at 294.584,89.58 h1
  text "Rounded" at 304.521,89.58 h1
  text "v50h20" at 317.058,89.58 h1
  text "133" at 219.358,87.08 h1
  text "0.250mm (9.84mil)" at 229.422,87.08 h1
  text "PTH" at 248.65,87.08 h1
  text "Round" at 257.188,87.08 h1
  text "Top Layer - Bottom Layer" at 269.524,87.08 h1
  text "Via" at 294.584,87.08 h1
  text "Rounded" at 304.521,87.08 h1
  text "(Mixed)" at 317.058,87.08 h1
  text "256" at 219.358,84.58 h1
  text "0.300mm (11.81mil)" at 229.422,84.58 h1
  text "PTH" at 248.65,84.58 h1
  text "Round" at 257.188,84.58 h1
  text "Top Layer - Bottom Layer" at 269.524,84.58 h1
  text "Via" at 294.584,84.58 h1
  text "Rounded" at 304.521,84.58 h1
  text "(Mixed)" at 317.058,84.58 h1
  text "408 Total" at 219.358,82.08 h1
Mechanical 31:
  lines w0.127: 47.818,86.995 52.898,86.995 ; 47.818,135.255 52.898,135.255 ; 47.818,183.515 52.898,183.515 ; 52.898,51.435 167.198,51.435 ; 52.898,59.055 167.198,59.055 ; 75.758,43.815 75.758,59.055 ; 120.843,38.735 120.843,43.815 ; 120.843,226.695 120.843,231.775 ; 129.098,43.815 129.098,59.055 129.098,74.295 ; 129.098,66.675 167.198,66.675 ; 193.868,38.735 193.868,43.815 ; 193.868,226.695 193.868,231.775 ; 202.758,43.815 167.198,43.815 ; 266.893,38.735 266.893,43.815 ; 266.893,226.695 266.893,231.775 ; 334.838,86.995 339.918,86.995 ; 334.838,135.255 339.918,135.255 ; 334.838,183.515 339.918,183.515 ; 52.898,43.815 52.898,74.295 129.098,74.295 ; 52.898,43.815 167.198,43.815 ; 52.898,43.815 52.898,226.695 334.838,226.695 334.838,43.815 52.898,43.815 ; 129.098,74.295 167.198,74.295 167.198,43.815 ; 47.818,38.735 47.818,231.775 339.918,231.775 339.918,38.735 47.818,38.735
  text "4" at 84.978,228.346 h1.78
  text "3" at 157.876,228.346 h1.78
  text "2" at 231.028,228.346 h1.78
  text "1" at 303.672,228.346 h1.78
  text "A" at 50.993,205.334 h1.78
  text "A" at 338.013,205.334 h1.78
  text "B" at 50.993,157.277 h1.78
  text "B" at 338.013,157.277 h1.78
  text "C" at 50.993,108.763 h1.78
  text "C" at 338.013,108.763 h1.78
  text "BOTTOM LAYER" at 211.1,104.8 h3
  text "TITLE:" at 127.828,71.755 h1.14
  text "ENGINEER:" at 165.928,71.755 h1.14
  text "Motion Control PCB" at 120.8,65.2 h3
  text "PCB DESIGNER:" at 165.928,64.262 h1.14
  text "AT" at 152.5,62.4 h2
  text "D" at 50.993,60.757 h1.78
  text "D" at 338.013,60.757 h1.78
  text "REV:" at 74.488,56.515 h1.14
  text "PART NO.:" at 127.828,56.515 h1.14
  text "DATE:" at 165.928,56.515 h1.14
  text "'.rev_number'" at 72.3,53.9 h1
  text ".PRINT_DATE" at 164.658,53.467 h1.78
  text "SCALE:" at 74.488,48.895 h1.14
  text "DWG NO:" at 127.828,48.895 h1.14
  text "FILE NAME:" at 165.928,48.895 h1.14
  text ".PCB_FILE_NAME_NO_PATH" at 164.658,45.847 h1.78
  text "4" at 84.978,40.386 h1.78
  text "3" at 157.876,40.386 h1.78
  text "2" at 231.028,40.386 h1.78
  text "1" at 303.672,40.386 h1.78
Mechanical 32:
  drawing of 533 lines, arcs and shapes, not listed
  text "1" at 84.064,228.346 h1.78
  text "2" at 156.708,228.346 h1.78
  text "3" at 229.86,228.346 h1.78
  text "4" at 302.758,228.346 h1.78
  text "NOTES - (UNLESS OTHERWISE SPECIFIED)" at 79.6,215 h1.52
  text "FABRICATION CHART" at 282.15,213.9 h1.52
  text "* Base Material" at 60.85,209.375 h1.52
  text "Circuit Type" at 272.95,209.1 h1.27
  text "Copper" at 288.95,209.1 h1.27
  text "Weight" at 295.35,209.1 h1.27
  text "Layer Count" at 306.55,209.1 h1.27
  text "Glass Fibre Epoxy Resin Nema Grade FR4" at 93.2,209 h1.52
  text "* Hole Sizes" at 60.85,205.775 h1.52
  text "Drill Diameters shown are finished sizes after plating" at 93.2,205.4 h1.52
  text "A" at 49.723,205.334 h1.78
  text "A" at 336.743,205.334 h1.78
  text "1oz (35um)" at 291.579,204.935 h1.27
  text "X" at 288.836,204.732 h1.52
  text "PTH" at 274.95,204.7 h1.27
  text "2 Layer" at 308.55,204.7 h1.27
  text "* Plating" at 60.85,202.575 h1.52
  text "For 1oz copper board hole plating must be 0.5oz copper thickness min" at 93.2,202.2 h1.52
  text "2oz (71um)" at 291.579,201.735 h1.27
  text "X" at 272.25,201.5 h1.52
  text "SMD" at 274.95,201.5 h1.27
  text "X" at 305.75,201.5 h1.52
  text "4 Layer" at 308.55,201.5 h1.27
  text "* Standards" at 60.85,199.275 h1.52
  text "PCB shall meet UL-796, UL94V-0, RoHS compliant." at 93.2,198.9 h1.52
  text "Both" at 275.23,198.535 h1.27
  text "Other" at 291.579,198.535 h1.27
  text "Other" at 308.379,198.535 h1.27
  text "* Bow & Twist" at 60.85,196.075 h1.52
  text "Maximum PCB bow & twist to be 0.75%" at 93.2,195.7 h1.52
  text "Surface Finish" at 271.35,193.9 h1.27
  text "Finish Thickness" at 288.15,193.9 h1.27
  text "Core Thickness" at 304.95,193.9 h1.27
  text "* Changes" at 60.85,192.675 h1.52
  text "No Dimensional, Material or Process changes are allowed without" at 93.2,192.3 h1.52
  text "X" at 272.15,189.9 h1.52
  text "HASL(pB free)" at 274.55,189.9 h1.27
  text "2.0um (min)" at 291.75,189.9 h1.27
  text "1.0mm" at 308.55,189.9 h1.27
  text "explicit prior written permission" at 93.2,189.1 h1.52
  text "X" at 288.836,186.732 h1.52
  text "Gold Flash" at 274.55,186.7 h1.14
  text "3.0um (min)" at 291.75,186.7 h1.27
  text "1.6mm" at 308.55,186.7 h1.27
  text "X" at 305.65,186.5 h1.52
  text "* Material Tolerance" at 61.15,186 h1.52
  text "Core material thickness to be 1.6mm +/- 0.1mm" at 93.025,185.925 h1.52
  text "Other" at 274.779,183.722 h1.27
  text "Other" at 291.579,183.722 h1.27
  text "Other" at 308.379,183.722 h1.27
  text "Track Thickness" at 271.35,179.1 h1.27
  text "Copper Clearance" at 288.15,179.1 h1.27
  text "CTI Rating" at 305.35,179.1 h1.27
  text "0.1mm (min)" at 274.95,175.1 h1.27
  text "0.1mm (min)" at 291.75,175.1 h1.27
  text "CTI>=600" at 308.55,175.1 h1.27
  text "0.15mm(min)" at 274.95,171.9 h1.27
  text "X" at 289.05,171.9 h1.52
  text "0.15mm(min)" at 291.75,171.9 h1.27
  text "600>CTI>400" at 308.15,171.9 h1.27
  text "X" at 272,168.75 h1.52
  text "0.2mm (min)" at 274.95,168.7 h1.27
  text "0.2mm (min)" at 291.75,168.7 h1.27
  text "400>CTI>250" at 308.15,168.7 h1.27
  text "Other" at 274.779,165.722 h1.27
  text "Other" at 291.579,165.722 h1.27
  text "X" at 305.75,165.5 h1.52
  text "CTI>=175" at 308.15,165.5 h1.27
  text "B" at 49.723,157.277 h1.78
  text "B" at 336.743,157.277 h1.78
  text "C" at 49.723,108.763 h1.78
  text "C" at 336.743,108.763 h1.78
  text "Layer" at 71.45,83 h1
  text "Name" at 78.249,83 h1
  text "Material" at 93.878,83 h1
  text "Thickness" at 108.174,83 h1
  text "Constant" at 118.971,83 h1
  text "Board Layer Stack" at 128.435,83 h1
  text "Top Overlay" at 78.249,81 h1
  text "Top Solder" at 78.249,79 h1
  text "Solder Resist" at 93.878,79 h1
  text "0.025mm" at 108.174,79 h1
  text "3.5" at 118.971,79 h1
  text "1" at 71.45,77 h1
  text "Top Layer" at 78.249,77 h1
  text "Copper" at 93.878,77 h1
  text "0.036mm" at 108.174,77 h1
  text "Dielectric 1" at 78.249,75 h1
  text "FR-4" at 93.878,75 h1
  text "0.170mm" at 108.174,75 h1
  text "4.2" at 118.971,75 h1
  text "2" at 71.45,73 h1
  text "Signal Layer 1" at 78.249,73 h1
  text "Copper" at 93.878,73 h1
  text "0.018mm" at 108.174,73 h1
  text "ENGINEER:" at 221.808,71.755 h1.14
  text "TITLE:" at 259.908,71.755 h1.14
  text "Dielectric 3" at 78.249,71 h1
  text "1.194mm" at 108.174,71 h1
  text "4.2" at 118.971,71 h1
  text "3" at 71.45,69 h1
  text "Signal Layer 2" at 78.249,69 h1
  text "Copper" at 93.878,69 h1
  text "0.018mm" at 108.174,69 h1
  text "Dielectric 2" at 78.249,67 h1
  text "0.170mm" at 108.174,67 h1
  text "4.2" at 118.971,67 h1
  text "4" at 71.45,65 h1
  text "Bottom Layer" at 78.249,65 h1
  text "Copper" at 93.878,65 h1
  text "0.036mm" at 108.174,65 h1
  text "Motion Control PCB" at 266.5,65 h3
  text "PCB DESIGNER:" at 221.808,64.262 h1.14
  text "Bottom Solder" at 78.249,63 h1
  text "Solder Resist" at 93.878,63 h1
  text "0.025mm" at 108.174,63 h1
  text "3.5" at 118.971,63 h1
  text "AT" at 234.8,62.2 h2
  text "Bottom Overlay" at 78.249,61 h1
  text "D" at 49.723,60.757 h1.78
  text "D" at 336.743,60.757 h1.78
  text "DATE:" at 221.808,56.515 h1.14
  text "PART NO.:" at 259.908,56.515 h1.14
  text "REV:" at 313.248,56.515 h1.14
  text "'.rev_number'" at 315,53.7 h1
  text ".PRINT_DATE" at 223.078,53.467 h1.78
  text "FILE NAME:" at 221.808,48.895 h1.14
  text "DWG NO:" at 259.908,48.895 h1.14
  text "SCALE:" at 313.248,48.895 h1.14
  text ".PCB_FILE_NAME_NO_PATH" at 223.078,45.847 h1.78
  text "1" at 84.064,40.386 h1.78
  text "2" at 156.708,40.386 h1.78
  text "3" at 229.86,40.386 h1.78
  text "4" at 302.758,40.386 h1.78